# Altium PCB PCB1.PcbDoc
Units mm, origin at the board's own origin, x right, y up, seen from the top; angles counter-clockwise.
Board outline 85 x 70 mm, 2 copper layers (Top Layer, Bottom Layer); 24 components, 20 nets, 171 pads, 155 vias.
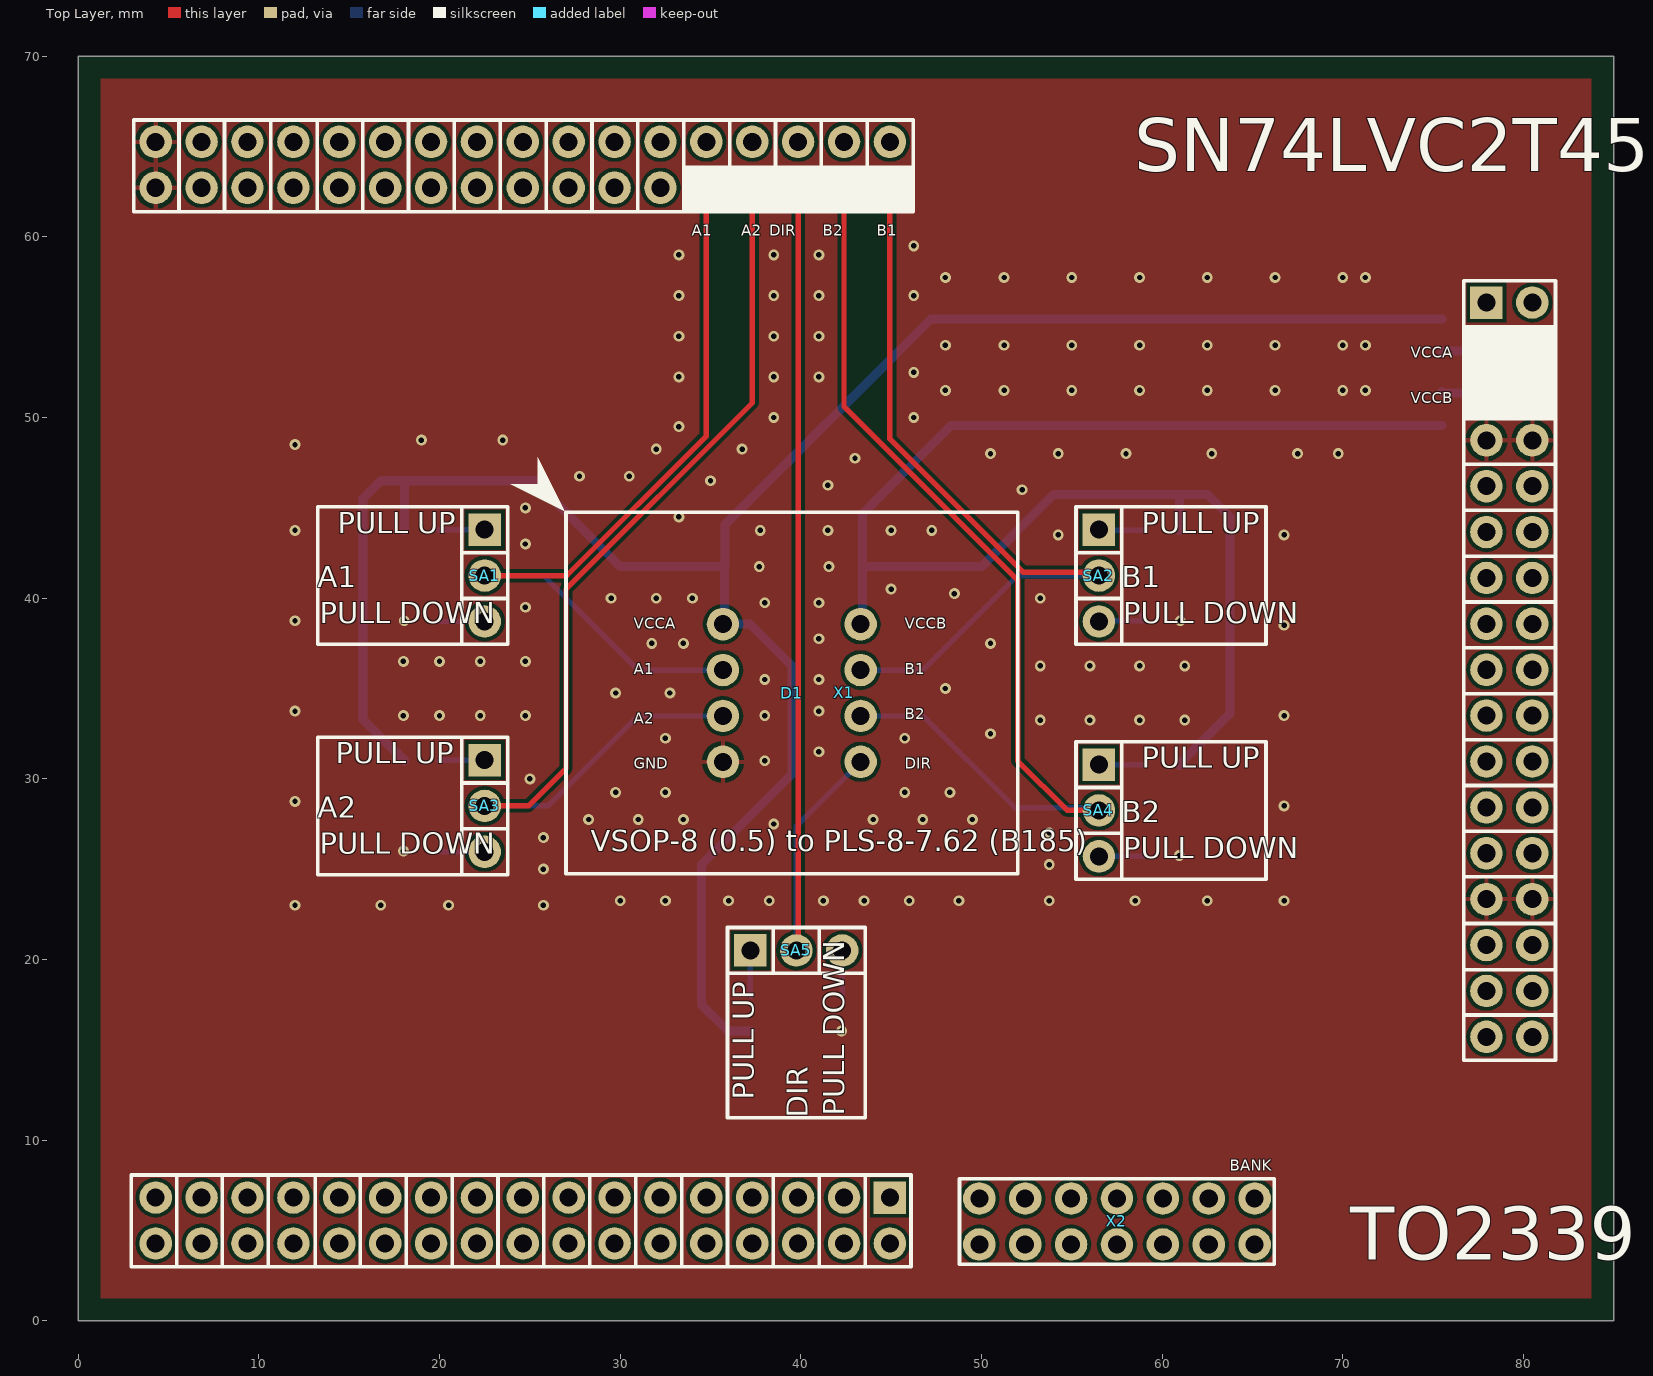
[diagram p0: Top Layer view]
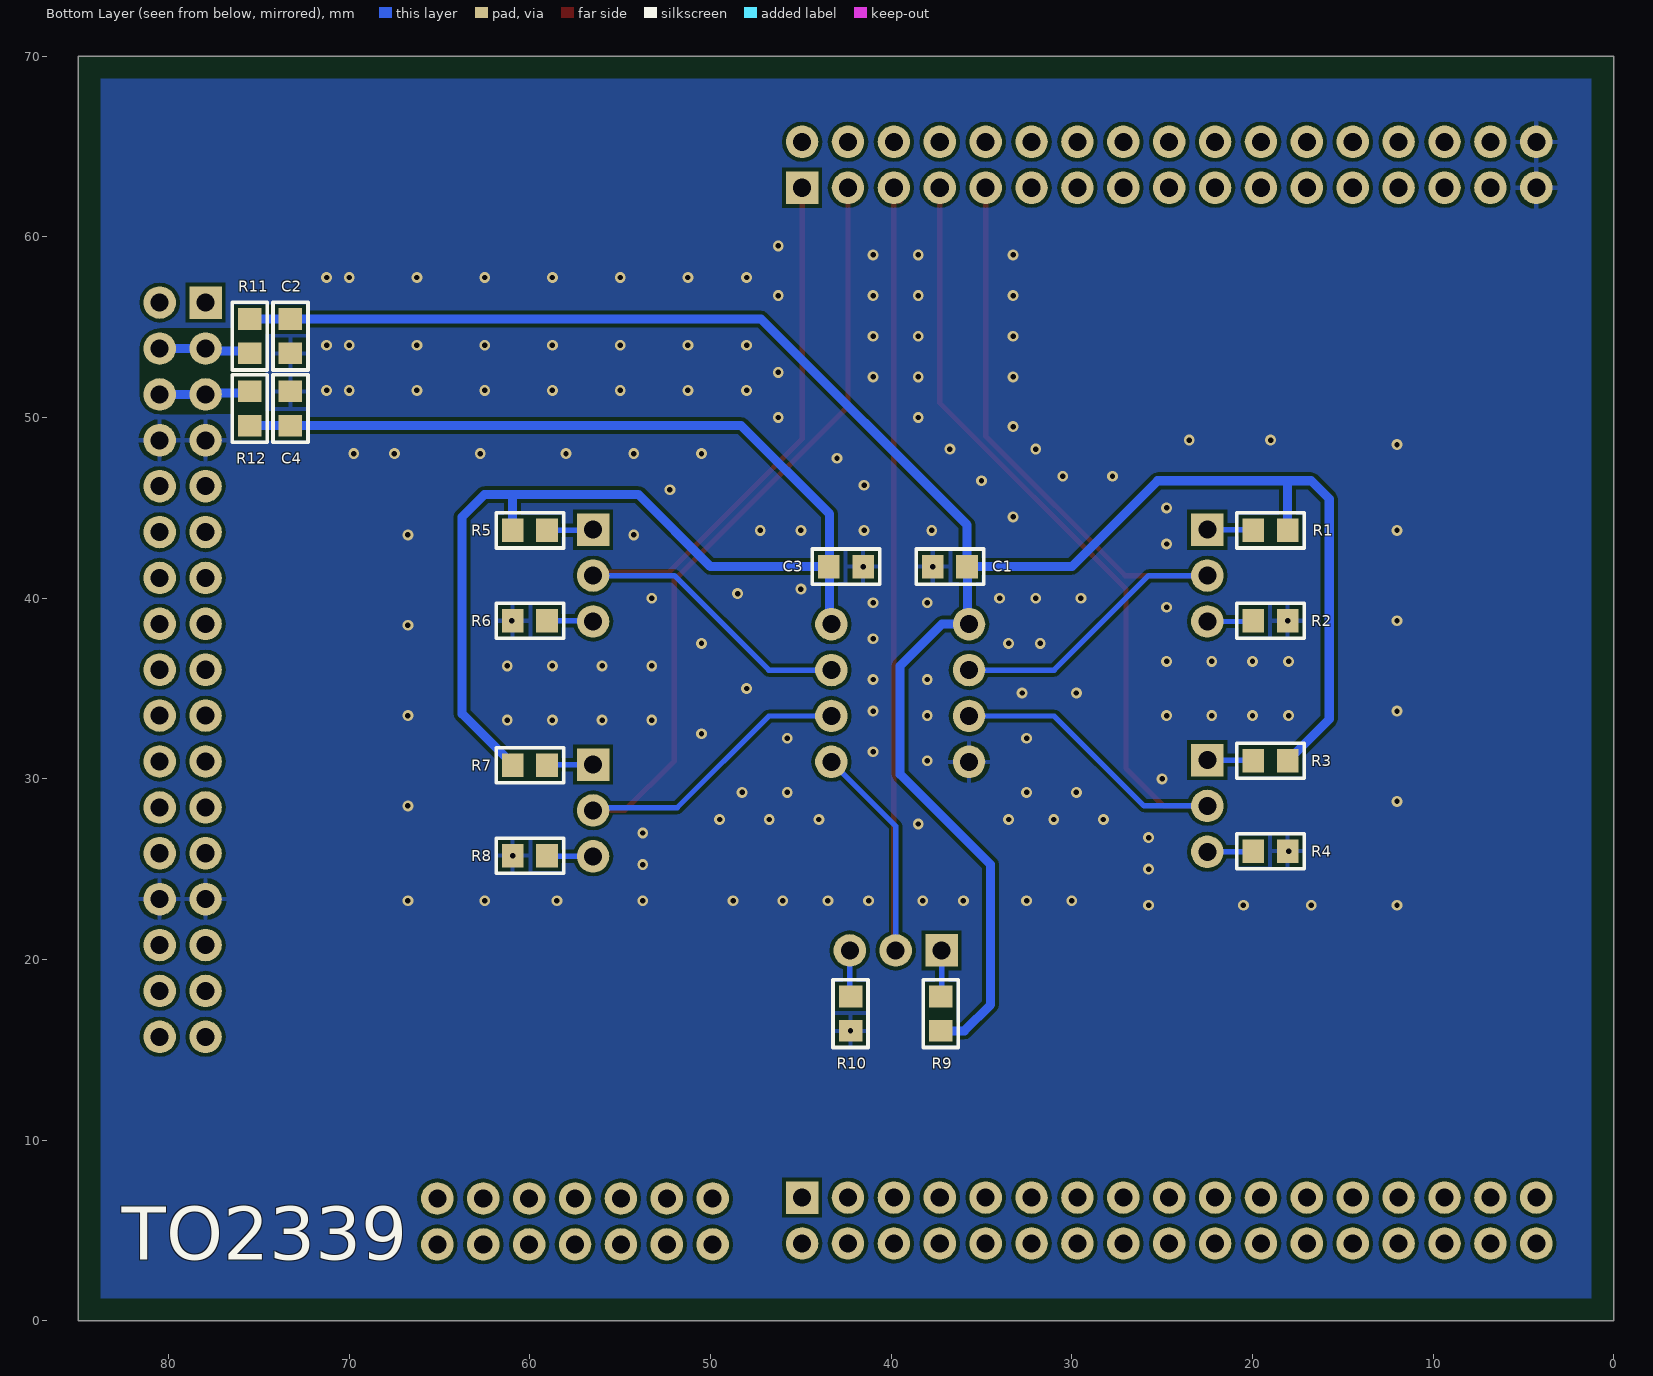
[diagram p1: Bottom Layer view, seen from below]

## Layer stack, top to bottom
Top Solder: solder mask 0.0102, Solder Resist, Dk 3.5
Top Layer: signal copper 0.0356
Dielectric 1: dielectric 0.32, FR-4, Dk 4.8
Bottom Layer: signal copper 0.0356
Bottom Solder: solder mask 0.0102, Solder Resist, Dk 3.5

## Board outline
0,0 85,0 85,70 0,70

## Design rules (kind name [scope] priority, off if disabled: settings)
Clearance [All] p1: gap=0.2 ignorepadtopadclearanceinfootprint=FALSE except(0: Arc-Hole Track-Hole SMDPad-Hole THPad-Hole Via-Hole Fill-Hole Poly-Hole Region-Hole Text-Hole)
PolygonConnect [All] p1: thpad.connectstyle=Relief thpad.reliefconductorwidth=0.254 thpad.reliefentries=4 thpad.polygonreliefangle="90 Angle" thpad.airgapwidth=0.254 smdpad.connectstyle=Relief smdpad.reliefconductorwidth=0.254 smdpad.reliefentries=4 smdpad.polygonreliefangle="90 Angle" smdpad.airgapwidth=0.254 via.connectstyle=Direct via.reliefconductorwidth=0.254 via.reliefentries=4 via.polygonreliefangle="90 Angle" via.airgapwidth=0.254
RoutingVias [All] p1: holewidth=0.3 width=0.6 viastyle="Through Hole" minholewidth=0.3 minwidth=0.6 maxholewidth=1.2 maxwidth=2.4
SilkToSilkClearance [All] p1: silktosilkclearance=0
SilkToSolderMaskClearance [IsPad] p1: minsilkscreentomaskgap=0 clearancetoexposedcopper=TRUE
SolderMaskExpansion [All] p1: expansion=0.102 istentingtop=FALSE
Width [All] p1: maxlimit=1 minlimit=0.3 preferedwidth=0.3
28 further rules are at their usual default settings.

## Components (designator, comment, footprint, x,y, rotation, side; value= is the part's Value field where it differs from the comment)
C1 "0.1uF" 0805 36.75,41.75 r0 bottom
C2 "10uF" 0805 73.25,54.5 r270 bottom
C3 "0.1uF" 0805 42.5,41.75 r180 bottom
C4 "10uF" 0805 73.25,50.5 r90 bottom
D1 "Dual-Bit Dual-Supply Bus Transceiver With Configurable Voltage" PLS-8-7.62 39.5,34.75 r0 top locked
R1 "10k" 0805 19,43.75 r180 bottom
R2 "10k" 0805 19,38.75 r180 bottom
R3 "10k" 0805 19,31 r180 bottom
R4 "10k" 0805 19,26 r180 bottom
R5 "10k" 0805 60,43.75 r0 bottom
R6 "10k" 0805 60,38.75 r0 bottom
R7 "10k" 0805 60,30.75 r0 bottom
R8 "10k" 0805 60,25.75 r0 bottom
R9 "10k" 0805 37.25,17 r270 bottom
R10 "10k" 0805 42.25,17 r270 bottom
R11 "0" 0805 75.5,54.5 r270 bottom
R12 "0" 0805 75.5,50.5 r90 bottom
SA1 "JUMPER_2" PLS3-2,54 22.5,41.25 r270 top
SA2 "JUMPER_2" PLS3-2,54 56.5,41.25 r270 top
SA3 "JUMPER_2" PLS3-2,54 22.5,28.5 r270 top
SA4 "JUMPER_2" PLS3-2,54 56.5,28.25 r270 top
SA5 "JUMPER_2" PLS3-2,54 39.75,20.5 r0 top
X1 "FORMULA" FORMULA 32.75,33.5 r0 top locked
X2 "PBD-14" PBD-14 57.5,5.5 r90 top

## Footprints (in the part's own frame and the unit in brackets; to place one, negate y for a bottom-side part, rotate by r counter-clockwise, add the part's x,y. Pads: shape width x height; smd on the part's side, far side on the other; paste and mask are expansions set on the pad)
0805 [mm]
  rect 1.2x1.3 smd: 1(-0.95,0) 2(0.95,0)
  silkscreen extent -1.87,-0.97 1.87,0.97, body extent -1.05,-0.63 0.95,0.63, height 0.55
FORMULA [mm]
  rect 1.8x1.8 hole 1: 1(12.18,29.22) VDDF(12.18,-26.68) VEEF(45.2,22.86)
  round 1.8 hole 1: 2(9.64,29.22) 3(7.1,29.22) 4(4.56,29.22) 5(2.02,29.22) 6(-0.52,29.22) 7(-3.06,29.22) 8(-5.6,29.22) 9(-8.14,29.22) 10(-10.68,29.22) 11(-13.22,29.22) 12(-15.76,29.22) 13(-18.3,29.22) 14(-20.84,29.22) 15(-23.38,29.22) 16(-25.92,29.22) 17(12.18,31.76) 18(9.64,31.76) 19(7.1,31.76) 20(4.56,31.76) 21(2.02,31.76) 22(-0.52,31.76) 23(-3.06,31.76) 24(-5.6,31.76) 25(-8.14,31.76) 26(-10.68,31.76) 27(-13.22,31.76) 28(-15.76,31.76) 29(-18.3,31.76) 30(-20.84,31.76) 31(-23.38,31.76) 32(-25.92,31.76) 33(-28.46,-29.22) 34(-25.92,-29.22) 35(-23.38,-29.22) 36(-20.84,-29.22) 37(-18.3,-29.22) 38(-15.76,-29.22) 39(-13.22,-29.22) 40(-10.68,-29.22) 41(-8.14,-29.22) 42(-5.6,-29.22) 43(-3.06,-29.22) 44(-0.52,-29.22) 45(2.02,-29.22) 46(4.56,-29.22) 47(7.1,-29.22) 48(9.64,-29.22) 49(-28.46,-26.68) 50(-25.92,-26.68) 51(-23.38,-26.68) 52(-20.84,-26.68) 53(-18.3,-26.68) 54(-15.76,-26.68) 55(-13.22,-26.68) 56(-10.68,-26.68) 57(-8.14,-26.68) 58(-5.6,-26.68) 59(-3.06,-26.68) 60(-0.52,-26.68) 61(2.02,-26.68) 62(4.56,-26.68) 63(7.1,-26.68) 64(9.64,-26.68) +5V(45.2,-15.24) +5V(47.74,-15.24) +5V_VCCF(45.2,20.32) +5V_VCCS(47.74,20.32) +5V_VDDF(45.2,17.78) +5V_VDDS(47.74,17.78) +12V(45.2,-12.7) +12V(47.74,-12.7) -12V(45.2,-17.78) -12V(47.74,-17.78) GND(-28.46,29.22) GND(-28.46,31.76) GND(45.2,-10.16) GND(45.2,15.24) GND(47.74,-10.16) GND(47.74,15.24) IN-OUT1(47.74,10.16) IN-OUT2(47.74,7.62) IN-OUT3(47.74,5.08) IN-OUT4(47.74,2.54) IN-OUT5(47.74,0) IN-OUT6(47.74,-2.54) IN-OUT7(47.74,-5.08) IN-OUT8(47.74,-7.62) NC(45.2,12.7) NC(47.74,12.7) OUT1(45.2,10.16) OUT2(45.2,7.62) OUT3(45.2,5.08) OUT4(45.2,2.54) OUT5(45.2,0) OUT6(45.2,-2.54) OUT7(45.2,-5.08) OUT8(45.2,-7.62) VDDS(12.18,-29.22) VEES(47.74,22.86)
  silkscreen extent -29.8,-30.51 49.02,32.97, body extent -29.79,-30.4 48.98,32.92, height 3
PBD-14 [mm]
  round 1.8 hole 1: 1(-1.27,7.62) 2(-1.27,5.08) 3(-1.27,2.54) 4(-1.27,0) 5(-1.27,-2.54) 6(-1.27,-5.08) 7(-1.27,-7.62) 8(1.27,-7.62) 9(1.27,-5.08) 10(1.27,-2.54) 11(1.27,0) 12(1.27,2.54) 13(1.27,5.08) 14(1.27,7.62)
  silkscreen extent -2.37,-8.7 2.35,8.72
PLS3-2,54 [mm]
  rect 1.8x1.8 hole 1: 1(-2.54,0)
  round 1.8 hole 1: 2(0,0) 3(2.54,0)
  silkscreen extent -3.81,-1.27 3.81,1.27, body extent -3.81,-1.27 3.81,1.27, height 8.54
PLS-8-7.62 [mm]
  round 1.8 hole 1: 1(-3.81,3.81) 2(-3.81,1.27) 3(-3.81,-1.27) 4(-3.81,-3.81) 5(3.81,-3.81) 6(3.81,-1.27) 7(3.81,1.27) 8(3.81,3.81)
  silkscreen extent -15.56,-10 12.5,13.06, body extent -5.06,-5.33 5.06,5.33, height 8.5

## Part data
C1 C2 C3 C4: library part C0805, ComponentHeigt=1.3, Firme=AVX, KIND=Конденсатор, Leadform=SMD, Packaging=0805
D1: library part SN74LVC2T45
R1 R2 R3 R4 R5 R6 R7 R8 R9 R10 R11 R12: library part "R0805 Yageo", ComponentHeigt=0.6, Firme=Yageo, KIND=Резистор, Leadform=SMD, Packaging=0805

## Via types
v1: diameter 0.6, hole 0.3, Top Layer to Bottom Layer, tented both sides, 155 vias

## Nets (pads, with @x,y where several pads share a name; then routed paths per layer and width w, separated by ;. In a path a pad name is that pad's centre, name@x,y a point inside that pad or via, vN(x,y) a via of type N, cw(c..) or ccw(c..) an arc to the next point about the centre after c; other vN are vias at no path point)
+5V_VCC: R11.2 X1.+5V_VCCF X1.+5V_VCCS | length 5.1
  Bottom Layer w0.5: R11.2 75.635,53.685 77.815,53.685 X1.+5V_VCCF X1.+5V_VCCS
+5V_VDD: R12.2 X1.+5V_VDDF X1.+5V_VDDS | length 5.1
  Bottom Layer w0.5: R12.2 75.585,51.365 77.865,51.365 X1.+5V_VDDF X1.+5V_VDDS
A1_SN74: D1.2 SA1.2 X1.5 | length 44.6
  Top Layer w0.3: SA1.2 27.043,41.25 34.77,48.977 X1.5
  Bottom Layer w0.3: SA1.2 25.75,41.25 30.98,36.02 D1.2
A2_SN74: D1.3 SA3.2 X1.4 | length 57
  Top Layer w0.3: SA3.2 24.919,28.5 27,30.581 27,40.5 37.31,50.81 X1.4
  Bottom Layer w0.3: SA3.2 26,28.5 30.98,33.48 D1.3
B1_SN74: D1.7 SA2.2 X1.1 | length 44
  Top Layer w0.3: X1.1 44.93,48.82 52.305,41.445 56.305,41.445 SA2.2
  Bottom Layer w0.3: D1.7 46.77,36.02 52,41.25 SA2.2
B2_SN74: D1.6 SA4.2 X1.2 | length 56.7
  Top Layer w0.3: X1.2 42.39,60.86 42.39,50.61 52,41 52,31 54.75,28.25 SA4.2
  Bottom Layer w0.3: D1.6 46.77,33.48 51.85,28.4 56.35,28.4 SA4.2
DIR_SN74: D1.5 SA5.2 X1.3 | length 54.7
  Top Layer w0.3: X1.3@39.5,61.964 X1.3@39.85,62.314 ; SA5.2 39.85,20.6 X1.3@39.85,62.314 ; X1.3 X1.3@39.85,62.314
  Bottom Layer w0.3: SA5.2 39.75,27.38 D1.5
GND: C1.2 C2.2 C3.2 C4.2 D1.4 R2.2 R4.2 R6.2 R8.2 R10.2 X1.GND
  other v1: 42.25,16.05 12,23 16.75,23 20.5,23 25.75,23 30,23.25 32.5,23.25 36,23.25 38.25,23.25 41.25,23.25 43.5,23.25 46,23.25 48.75,23.25 53.75,23.25 58.5,23.25 62.5,23.25 66.75,23.25 25.75,25 53.75,25.25 60.95,25.75 18,26 25.75,26.75 53.75,27 38.5,27.5 28.25,27.75 31,27.75 33.5,27.75 44,27.75 46.75,27.75 49.5,27.75 66.75,28.5 12,28.75 29.75,29.25 32.5,29.25 45.75,29.25 48.25,29.25 25,30 38,31 41,31.5 32.5,32.25 45.75,32.25 50.5,32.5 53.25,33.25 56,33.25 58.75,33.25 61.25,33.25 18,33.5 20,33.5 22.25,33.5 24.75,33.5 38,33.5 66.75,33.5 12,33.75 41,33.75 29.75,34.75 32.75,34.75 48,35 38,35.5 41,35.5 53.25,36.25 56,36.25 58.75,36.25 61.25,36.25 18,36.5 20,36.5 22.25,36.5 24.75,36.5 31.75,37.5 33.5,37.5 50.5,37.5 41,37.75 66.75,38.5 12,38.75 18.05,38.75 61,38.75 24.75,39.5 38,39.75 41,39.75 29.5,40 32,40 34,40 53.25,40 48.5,40.25 45,40.5 37.7,41.75 41.55,41.75 24.75,43 54.25,43.5 66.75,43.5 12,43.75 37.75,43.75 41.5,43.75 45,43.75 47.25,43.75 33.25,44.5 24.75,45 52.25,46 41.5,46.25 35,46.5 27.75,46.75 30.5,46.75 43,47.75 50.5,48 54.25,48 58,48 62.75,48 67.5,48 69.75,48 32,48.25 36.75,48.25 12,48.5 19,48.75 23.5,48.75 33.25,49.5 38.5,50 46.25,50 48,51.5 51.25,51.5 55,51.5 58.75,51.5 62.5,51.5 66.25,51.5 70,51.5 71.25,51.5 33.25,52.25 38.5,52.25 41,52.25 46.25,52.5 48,54 51.25,54 55,54 58.75,54 62.5,54 66.25,54 70,54 71.25,54 33.25,54.5 38.5,54.5 41,54.5 33.25,56.75 38.5,56.75 41,56.75 46.25,56.75 48,57.75 51.25,57.75 55,57.75 58.75,57.75 62.5,57.75 66.25,57.75 70,57.75 71.25,57.75 33.25,59 38.5,59 41,59 46.25,59.5
NetR1_1: R1.1 SA1.1 | length 2.6
  Bottom Layer w0.3: R1.1 19.99,43.79 SA1.1
NetR2_1: R2.1 SA1.3 | length 2.6
  Bottom Layer w0.3: R2.1 19.99,38.71 SA1.3
NetR3_1: R3.1 SA3.1 | length 2.6
  Bottom Layer w0.3: R3.1 19.99,31.04 SA3.1
NetR4_1: R4.1 SA3.3 | length 2.6
  Bottom Layer w0.3: R4.1 19.99,25.96 SA3.3
NetR5_1: R5.1 SA2.1 | length 2.6
  Bottom Layer w0.3: SA2.1 56.54,43.75 R5.1
NetR6_1: R6.1 SA2.3 | length 2.9
  Bottom Layer w0.3: SA2.3 56.54,38.75 R6.1 ; R6.1@58.84,39.04 R6.1@59.05,39.25
NetR7_1: R7.1 SA4.1 | length 2.6
  Bottom Layer w0.3: SA4.1 59.01,30.79 R7.1
NetR8_1: R8.1 SA4.3 | length 2.6
  Bottom Layer w0.3: SA4.3 59.01,25.71 R8.1
NetR9_1: R9.1 SA5.1 | length 2.6
  Bottom Layer w0.3: SA5.1 37.21,17.99 R9.1
NetR10_1: R10.1 SA5.3 | length 2.6
  Bottom Layer w0.3: R10.1 42.29,17.99 SA5.3
VCCA_SN74: C1.1 C2.1 D1.1 R1.2 R3.2 R9.2 R11.1 | length 119.4
  Bottom Layer w0.5: R3.2 18.05,31.05 17.7,31.4 17.65,31.4 15.75,33.3 15.75,45.5 16.75,46.5 18,46.5 ; R1.2 18.05,46.45 18,46.5 ; D1.1 37.19,38.56 39.5,36.25 39.5,30.25 34.5,25.25 34.5,17.5 35.95,16.05 R9.2 ; D1.1@35.75,38.75 35.775,38.775 35.775,41.725 C1.1 ; R11.1 C2.1 47.2,55.45 35.8,44.05 C1.1 ; 18,46.5 25.25,46.5 30,41.75 C1.1
VCCB_SN74: C3.1 C4.1 D1.8 R5.2 R7.2 R12.1 | length 79.4
  Bottom Layer w0.5: D1.8@43.37,38.75 43.41,38.79 43.41,44.66 48.3,49.55 C4.1 R12.1 ; C3.1 50,41.75 54,45.75 60.95,45.75 ; R7.2 60.95,30.8 63.75,33.6 63.75,44.5 62.5,45.75 60.95,45.75 ; R5.2 60.95,45.75
pads on no net: X1.6 X1.7 X1.8 X1.9 X1.10 X1.11 X1.12 X1.13 X1.14 X1.15 X1.16 X1.17 X1.18 X1.19 X1.20 X1.21 X1.22 X1.23 X1.24 X1.25 X1.26 X1.27 X1.28 X1.29 X1.30 X1.31 X1.32 X1.33 X1.34 X1.35 X1.36 X1.37 X1.38 X1.39 X1.40 X1.41 X1.42 X1.43 X1.44 X1.45 X1.46 X1.47 X1.48 X1.49 X1.50 X1.51 X1.52 X1.53 X1.54 X1.55 X1.56 X1.57 X1.58 X1.59 X1.60 X1.61 X1.62 X1.63 X1.64 X1.+5V X1.+12V X1.-12V X1.IN-OUT1 X1.IN-OUT2 X1.IN-OUT3 X1.IN-OUT4 X1.IN-OUT5 X1.IN-OUT6 X1.IN-OUT7 X1.IN-OUT8 X1.NC X1.OUT1 X1.OUT2 X1.OUT3 X1.OUT4 X1.OUT5 X1.OUT6 X1.OUT7 X1.OUT8 X1.VDDF X1.VDDS X1.VEEF X1.VEES X2.1 X2.2 X2.3 X2.4 X2.5 X2.6 X2.7 X2.8 X2.9 X2.10 X2.11 X2.12 X2.13 X2.14

## Polygon pours and split planes (outlines as drawn)
GND on Top Layer "NONET_L-01_P-001" (solid, remove dead copper, pour order 0): 1.25,68.75 1.25,1.25 83.75,1.25 83.75,68.75
GND on Bottom Layer "NONET_L-01_P-001" (solid, remove dead copper, pour order 1): 1.25,68.75 1.25,1.25 83.75,1.25 83.75,68.75

## Other copper
Top Layer:
  pour cut-out: 39.85,63.829 39.85,61.79 42.39,61.79 42.39,63.829
  pour cut-out: 42.39,63.829 44.93,63.829 44.93,62.72
  pour cut-out: 39.85,61.611 34.77,61.611 34.77,62.72
  pour cut-out: 34.77,63.829 39.85,63.829 39.85,62.72
Bottom Layer:
  pour cut-out: 76.35,56.25 72.4,56.25 72.4,54.65 76.35,54.65
  pour cut-out: 72.4,50.35 76.35,50.35 76.35,48.75 72.4,48.75
  pour cut-out: 17.25,44.6 20.75,44.6 20.75,42.9 17.25,42.9
  pour cut-out: 20.75,31.85 17.25,31.85 17.25,30.15 20.75,30.15
  pour cut-out: 36.4,18.75 38.1,18.75 38.1,15.25 36.4,15.25
  pour cut-out: 61.75,29.9 58.25,29.9 58.25,31.6 61.75,31.6
  pour cut-out: 58.25,44.6 58.25,42.9 61.75,42.9 61.75,44.6
  pour cut-out: 74.65,56.25 74.65,48.75 76.35,48.75 76.35,56.25
  pour cut-out: 80.49,50.171 77.95,50.171 77.95,51.28
  pour cut-out: 77.663,50.208 75.5,50.208 75.5,51.45
  pour cut-out: 77.95,54.929 75.5,54.929 75.5,53.55
  pour cut-out: 81.599,53.82 81.599,51.28 80.49,51.28
  pour cut-out: 80.49,52.711 77.95,52.711 77.95,53.82
  pour cut-out: 77.95,54.929 80.49,54.929 80.49,53.82

## Silkscreen, mask and mechanical layers (free items; w line width, h text height)
Top Overlay:
  region: 76.693,55.028 76.693,49.948 81.773,49.948 81.773,55.028
  region: 33.52,63.93 33.52,61.39 46.22,61.39 46.22,63.93
  lines w0.2: 13.25,24.69 21.23,24.69 21.23,32.31 13.25,32.31 13.25,24.69 ; 13.25,37.44 21.23,37.44 21.23,45.06 13.25,45.06 13.25,37.44 ; 35.94,11.25 43.56,11.25 43.56,19.23 35.94,19.23 35.94,11.25 ; 57.77,24.44 65.75,24.44 65.75,32.06 57.77,32.06 57.77,24.44 ; 57.77,37.44 65.75,37.44 65.75,45.06 57.77,45.06 57.77,37.44
  text "SN74LVC2T45" at 58.462,62.669 h5
  text "A1" at 33.95,60.05 h0.6
  text "A2" at 36.7,60.05 h0.6
  text "DIR" at 38.251,60.05 h0.6
  text "B2" at 41.2,60.05 h0.6
  text "B1" at 44.2,60.05 h0.6
  text "VCCA" at 73.751,53.3 h0.6
  text "VCCB" at 73.751,50.8 h0.6
  text "PULL UP" at 14.375,43.218 h2
  text "PULL UP" at 58.875,43.218 h2
  text "A1" at 13.25,40.218 h2
  text "B1" at 57.77,40.218 h2
  text "VCCA" at 30.751,38.3 h0.6
  text "VCCB" at 45.751,38.3 h0.6
  text "PULL DOWN" at 13.359,38.218 h2
  text "PULL DOWN" at 57.859,38.218 h2
  text "A1" at 30.751,35.8 h0.6
  text "B1" at 45.751,35.8 h0.6
  text "B2" at 45.751,33.3 h0.6
  text "A2" at 30.751,33.05 h0.6
  text "GND" at 30.751,30.55 h0.6
  text "DIR" at 45.751,30.55 h0.6
  text "PULL UP" at 14.25,30.468 h2
  text "PULL UP" at 58.875,30.218 h2
  text "A2" at 13.25,27.468 h2
  text "B2" at 57.77,27.218 h2
  text "PULL DOWN" at 13.359,25.468 h2
  text "PULL DOWN" at 57.859,25.218 h2
  text "PULL UP" at 37.782,12.25 h2 r90
  text "PULL DOWN" at 42.782,11.359 h2 r90
  text "DIR" at 40.782,11.25 h2 r90
  text "BANK" at 63.751,8.3 h0.6
  text "ТО2339" at 70.403,2.419 h5
Bottom Overlay:
  text "ТО2339" at 82.597,2.419 h5
Board:
  the board outline again, w0.2

## Dimensions
85,70 to 85,0 on Dimension
0,70 to 85,70 on Dimension

## Text inside footprints (layer, text, board x,y; h text height)
D1: Top Overlay "VSOP-8 (0.5) to PLS-8-7.62 (B185)" at 28.369,25.615 h2